# EAGLE board Orb routing checkpoint 01 (EAGLE 9.7.0)
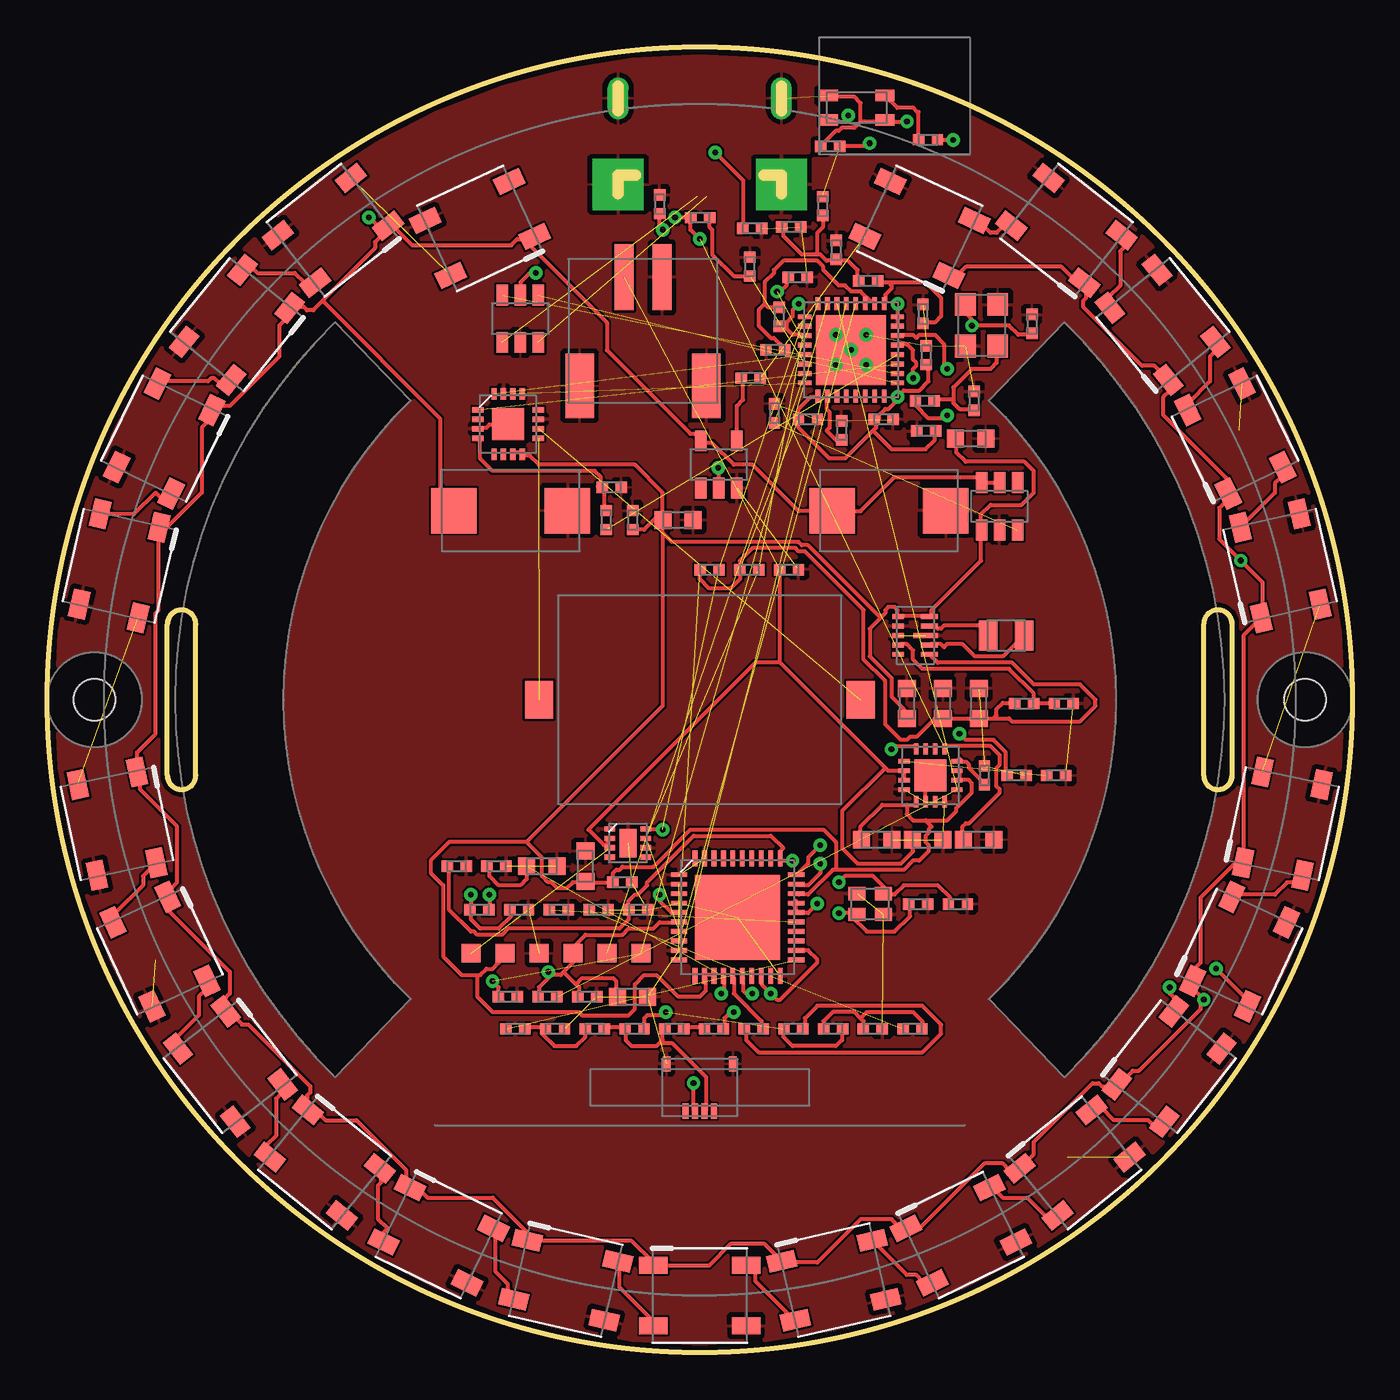
[diagram p0: board, top side]
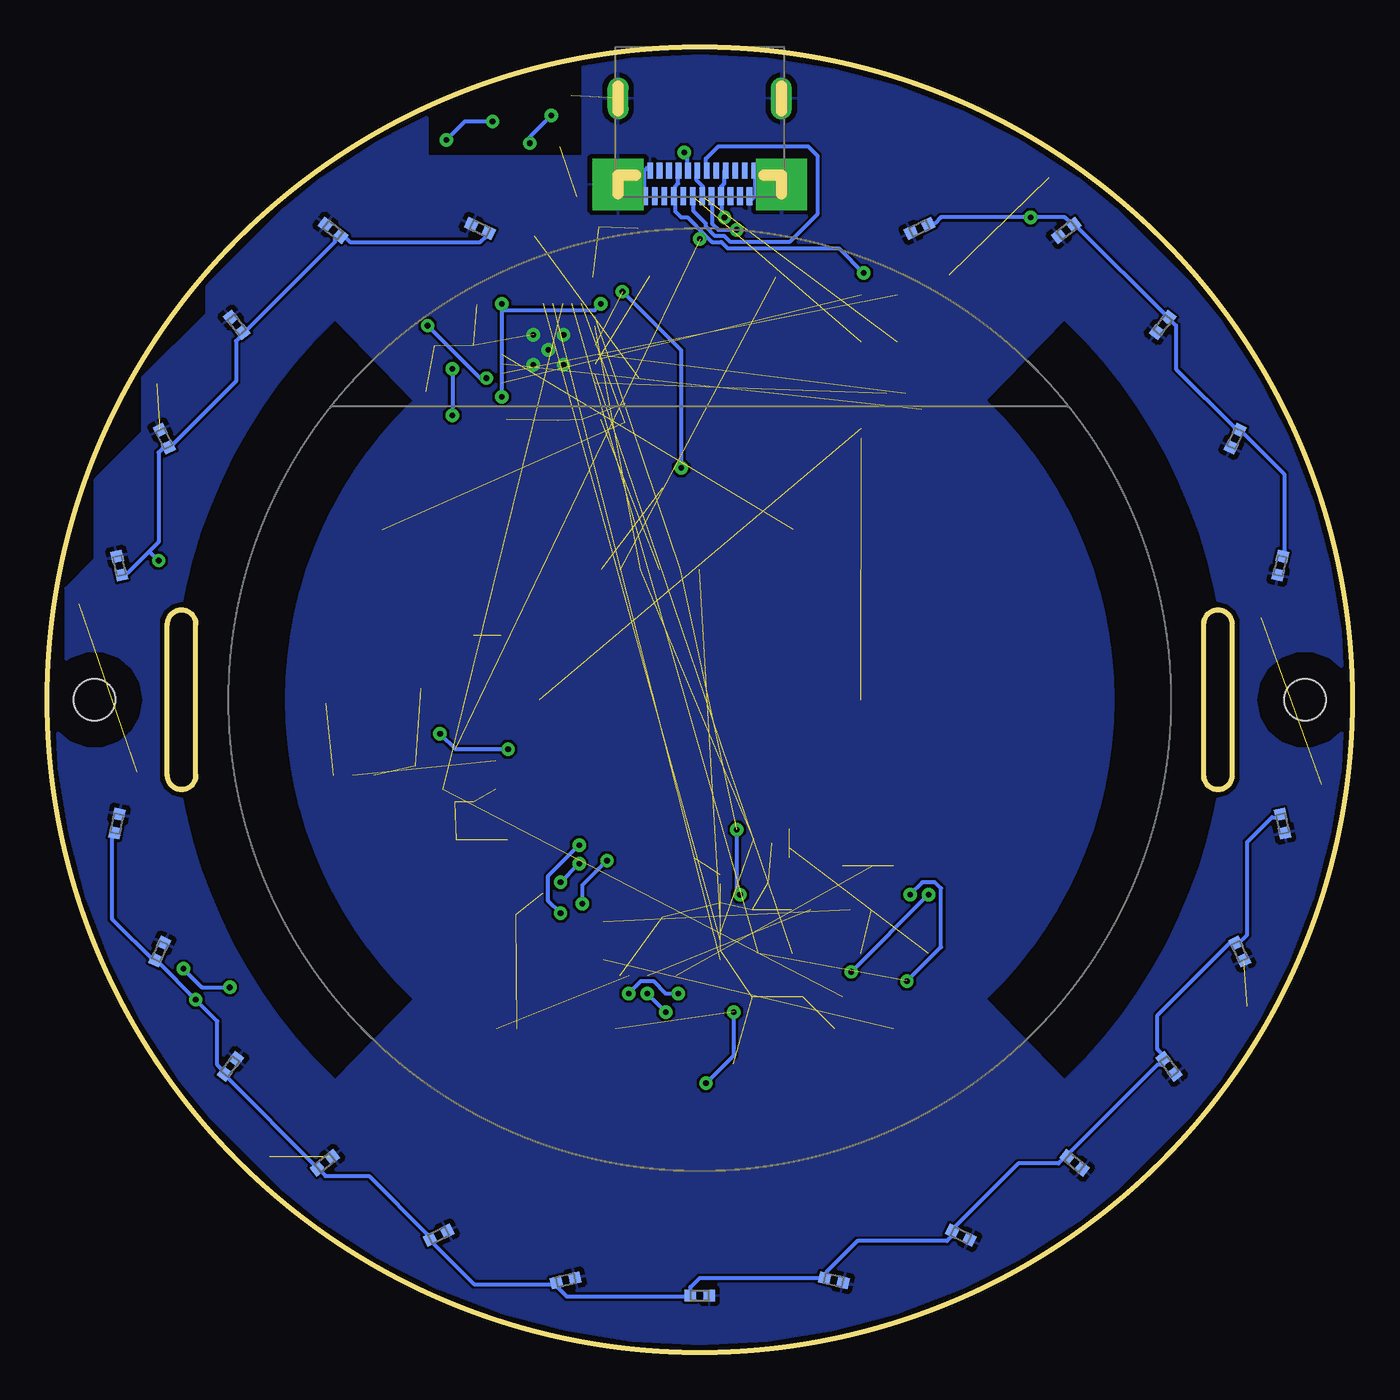
[diagram p1: board, bottom side, seen from below]

Size 69 x 69 mm. Coordinates in mm from the lower left corner, seen from the top.
Outline: 7.85,30.5 7.85,38.5 arc180 6.35,38.5 6.35,30.5 arc180 7.85,30.5
Outline: 62.65,30.5 62.65,38.5 arc180 61.15,38.5 61.15,30.5 arc180 62.65,30.5
Outline: circle at 34.5,34.5 radius 34.5
Copper layers (1*16): Top / Bottom
Stack-up Default Layer Stack: Top User Defined 0.035mm / Dielectric-1 User Defined 1.5mm / Bottom User Defined 0.035mm
Design rules: minimum drill size class=0 0.3mm, minimum drill size 0.3mm, minimum copper width class=0 0.2mm, minimum copper width 0.15mm, keepout clearance 0mil, drill distance 6mil, via restrict clearance 0mil, dimension clearance 0.25mm, restrict clearance 0mil, copper clearance wire_polygon to wire_polygon 5mil, copper clearance wire_polygon to pad_smd 5mil, copper clearance wire_polygon to via 5mil, copper clearance pad_smd to pad_smd 5mil, copper clearance pad_smd to via 5mil, copper clearance via to via 5mil, copper clearance smd to pad (same net) 5mil, copper clearance smd to via (same net) 5mil, copper clearance smd to smd (same net) 5mil
Net classes: 0 default: width 0.2 mm, drill 0.3 mm
Holes 2.2 mm at 2.5,34.5 66.5,34.5
RestrictCopper: area -0.1,32 to 5.1,37; area 63.9,32 to 69.1,37; area 49.7,14.5 to 62.3,54.5; area 6.7,14.5 to 19.3,54.5
vRestrict: area 49.7,14.5 to 62.3,54.5; area 6.7,14.5 to 19.3,54.5

## Footprints (pad centres in the part's own frame; a part is rotated, then mirrored left to right if it is on the bottom)
JOHANSON_2450AT18D = smd 1 x 0.6: 1 -1.5,-0.65; 2 1.5,-0.65; 3 1.5,0.65; 4 -1.5,0.65
C0603 = smd 0.9 x 0.95: 1 -0.8,0; 2 0.8,0
C0402 = smd 0.6 x 0.6: 1 -0.5,0; 2 0.5,0
CPOL7343 = smd 2.4 x 2.4: 1 -3,0; 2 3,0
SOT23_6 = smd 0.6 x 1.1: 1 -0.95,-1.25; 2 0,-1.25; 3 0.95,-1.25; 4 0.95,1.25; 5 0,1.25; 6 -0.95,1.25
USBC24_TE2345986 = smd 0.3 x 0.95: A1 2.625,-7.875; A2 2.125,-7.875; A3 1.625,-7.875; A4 1.125,-7.875; A5 0.625,-7.875; A6 0.125,-7.875; A7 -0.375,-7.875; A8 -0.875,-7.875; A9 -1.375,-7.875; A10 -1.875,-7.875; A11 -2.375,-7.875; A12 -2.875,-7.875 | smd 0.3 x 0.85: B1 -2.625,-6.525; B2 -2.125,-6.525; B3 -1.625,-6.525; B4 -1.125,-6.525; B5 -0.625,-6.525; B6 -0.125,-6.525; B7 0.375,-6.525; B8 0.875,-6.525; B9 1.375,-6.525; B10 1.875,-6.525; B11 2.375,-6.525; B12 2.875,-6.525 | drill 0.6 pad 2.7 square: S1 -4.32,-7.25; S2 4.32,-7.25 | drill 0.6 pad 1.075 long: S3 -4.32,-2.7; S4 4.32,-2.7
JST_S2B_PH_SM4_TB = smd 1 x 3.5: 1 -1,2.85; 2 1,2.85 | smd 1.5 x 3.4: S1 -3.35,-2.9; S2 3.35,-2.9
FPC4_PLACEHOLDER = smd 0.3 x 0.8: 1 0.75,-1.25; 2 0.25,-1.25; 3 -0.25,-1.25; 4 -0.75,-1.25 | smd 0.4 x 0.8: M1 -1.75,1.25; M2 1.75,1.25
L2016 = smd 1 x 1.6: 1 -0.95,0; 2 0.95,0
L0402 = smd 0.6 x 0.6: 1 -0.5,0; 2 0.5,0
WS2812B_5050 = smd 1.5 x 0.9: 1 -2.45,1.6; 2 -2.45,-1.6; 3 2.45,-1.6; 4 2.45,1.6
R0402 = smd 0.6 x 0.6: 1 -0.5,0; 2 0.5,0
SPK_PADS = smd 1.5 x 2: 1 -8.5,0; 2 8.5,0
TP1MM = smd 1 x 1: 1 0,0
ESP32C3_QFN32 = smd 0.7 x 0.25: 1 -2.45,1.75; 2 -2.45,1.25; 3 -2.45,0.75; 4 -2.45,0.25; 5 -2.45,-0.25; 6 -2.45,-0.75; 7 -2.45,-1.25; 8 -2.45,-1.75; 17 2.45,-1.75; 18 2.45,-1.25; 19 2.45,-0.75; 20 2.45,-0.25; 21 2.45,0.25; 22 2.45,0.75; 23 2.45,1.25; 24 2.45,1.75 | smd 0.25 x 0.7: 9 -1.75,-2.45; 10 -1.25,-2.45; 11 -0.75,-2.45; 12 -0.25,-2.45; 13 0.25,-2.45; 14 0.75,-2.45; 15 1.25,-2.45; 16 1.75,-2.45; 25 1.75,2.45; 26 1.25,2.45; 27 0.75,2.45; 28 0.25,2.45; 29 -0.25,2.45; 30 -0.75,2.45; 31 -1.25,2.45; 32 -1.75,2.45 | smd 3.7 x 3.7: 33 0,0
HVQFN40_6X6 = smd 0.85 x 0.25: 1 -3.1,2.25; 2 -3.1,1.75; 3 -3.1,1.25; 4 -3.1,0.75; 5 -3.1,0.25; 6 -3.1,-0.25; 7 -3.1,-0.75; 8 -3.1,-1.25; 9 -3.1,-1.75; 10 -3.1,-2.25; 21 3.1,-2.25; 22 3.1,-1.75; 23 3.1,-1.25; 24 3.1,-0.75; 25 3.1,-0.25; 26 3.1,0.25; 27 3.1,0.75; 28 3.1,1.25; 29 3.1,1.75; 30 3.1,2.25 | smd 0.25 x 0.85: 11 -2.25,-3.1; 12 -1.75,-3.1; 13 -1.25,-3.1; 14 -0.75,-3.1; 15 -0.25,-3.1; 16 0.25,-3.1; 17 0.75,-3.1; 18 1.25,-3.1; 19 1.75,-3.1; 20 2.25,-3.1; 31 2.25,3.1; 32 1.75,3.1; 33 1.25,3.1; 34 0.75,3.1; 35 0.25,3.1; 36 -0.25,3.1; 37 -0.75,3.1; 38 -1.25,3.1; 39 -1.75,3.1; 40 -2.25,3.1 | smd 4.5 x 4.5: 41 0,0
TDFN8_2X2 = smd 0.55 x 0.28: 1 -0.95,0.75; 2 -0.95,0.25; 3 -0.95,-0.25; 4 -0.95,-0.75; 5 0.95,-0.75; 6 0.95,-0.25; 7 0.95,0.25; 8 0.95,0.75 | smd 0.9 x 1.5: 9 0,0
VQFN16_3X3 = smd 0.6 x 0.24: 1 -1.4,0.75; 2 -1.4,0.25; 3 -1.4,-0.25; 4 -1.4,-0.75; 9 1.4,-0.75; 10 1.4,-0.25; 11 1.4,0.25; 12 1.4,0.75 | smd 0.24 x 0.6: 5 -0.75,-1.4; 6 -0.25,-1.4; 7 0.25,-1.4; 8 0.75,-1.4; 13 0.75,1.4; 14 0.25,1.4; 15 -0.25,1.4; 16 -0.75,1.4 | smd 1.68 x 1.68: 17 0,0
VSON10_2X3 = smd 0.6 x 0.25: 1 -0.9,1; 2 -0.9,0.5; 3 -0.9,0; 4 -0.9,-0.5; 5 -0.9,-1 | smd 0.9 x 0.25: 6 0.75,-1; 7 0.75,-0.5; 9 0.75,0.5; 10 0.75,1 | smd 1.3 x 0.25: 8 0.55,0
TQFN16_3X3 = smd 0.6 x 0.28: 1 -1.6,0.75; 2 -1.6,0.25; 3 -1.6,-0.25; 4 -1.6,-0.75; 9 1.6,-0.75; 10 1.6,-0.25; 11 1.6,0.25; 12 1.6,0.75 | smd 0.28 x 0.6: 5 -0.75,-1.6; 6 -0.25,-1.6; 7 0.25,-1.6; 8 0.75,-1.6; 13 0.75,1.6; 14 0.25,1.6; 15 -0.25,1.6; 16 -0.75,1.6 | smd 1.7 x 1.7: 17 0,0
SOT23_5 = smd 0.6 x 1.1: 1 -0.95,-1.25; 2 0,-1.25; 3 0.95,-1.25; 4 0.95,1.25; 5 -0.95,1.25
XTAL2016 = smd 0.9 x 0.7: 1 -0.7,-0.55; 2 0.7,-0.55; 3 0.7,0.55; 4 -0.7,0.55
ABM8_3225 = smd 1.2 x 1.1: 1 -1.1,-0.85; 2 1.1,-0.85; 3 1.1,0.85; 4 -1.1,0.85

## Placement (x,y rotation side)
ANT1  2450AT18D0100001E  [JOHANSON_2450AT18D]  42.8,65.8 0 top
C1  10uF  [C0603]  30.95,18.8 0 top
C2  100nF  [C0402]  28.55,18.8 0 top
C3  1uF  [C0402]  24.35,18.8 0 top
C4  4.7uF  [C0603]  49.25,27.1 0 top
C5  10uF  [C0603]  43.85,27.1 0 top
C6  10uF  [C0603]  46.55,27.1 0 top
C7  100nF  [C0402]  39.22,41.38 0 top
C8  10uF  [C0603]  45.45,34.3 90 top
C9  10uF  [C0603]  47.35,34.3 90 top
C10  10uF  [C0603]  49.25,34.3 90 top
C11  100nF  [C0402]  30.4,24.85 0 top
C12  4.7uF  [C0603]  28.45,25.7 90 top
C13  4.7uF  [C0603]  26.15,25.7 0 top
C14  100nF  [C0402]  23.75,25.7 0 top
C15  1uF  [C0402]  21.65,25.7 0 top
C16  100nF  [C0402]  31.25,23.4 0 top
C17  100nF  [C0402]  29.15,23.4 0 top
C18  100nF  [C0402]  27.05,23.4 0 top
C19  100nF  [C0402]  24.95,23.4 0 top
C20  12pF  [C0402]  46.05,23.7 0 top
C21  12pF  [C0402]  48.15,23.7 0 top
C22  TBD  [C0402]  26.85,17.1 0 top
C23  TBD  [C0402]  43.65,17.1 0 top
C24  TBD  [C0402]  28.95,17.1 0 top
C25  TBD  [C0402]  41.55,17.1 0 top
C26  TBD  [C0402]  31.05,17.1 0 top
C27  TBD  [C0402]  33.15,17.1 0 top
C28  TBD  [C0402]  39.45,17.1 0 top
C29  10uF  [C0603]  33.35,44 0 top
C30  100nF  [C0402]  30.95,44 90 top
C31  10uF  [C0603]  48.82,48.3 0 top
C32  100uF  [CPOL7343]  24.5,44.5 0 top
C33  100uF  [CPOL7343]  44.5,44.5 0 top
C34  1uF  [C0402]  38.5,53 180 top
C35  100nF  [C0402]  40.22,49.32 0 top
C36  100nF  [C0402]  44.22,49.32 0 top
C37  1uF  [C0402]  42,48.75 90 top
C38  1uF  [C0402]  46.48,52.72 90 top
C39  10nF  [C0402]  46.47,48.71 180 top
C40  16pF  [C0402]  49,50.3 90 top
C41  16pF  [C0402]  52.07,54.37 90 top
C42  1pF  [C0402]  46.3,54.9 90 top
C43  1pF  [C0402]  41.72,58.28 90 top
C44  1pF  [C0402]  39.34,59.5 0 top
C45  1pF  [C0402]  41.4,63.75 180 top
C101  100nF  [C0402]  46.12,59.42 155 bottom
C102  100nF  [C0402]  53.89,59.32 142 bottom
C103  100nF  [C0402]  58.98,54.32 129 bottom
C104  100nF  [C0402]  62.81,48.31 116 bottom
C105  100nF  [C0402]  65.19,41.59 103 bottom
C106  100nF  [C0402]  65.31,27.95 78 bottom
C107  100nF  [C0402]  63.05,21.19 65 bottom
C108  100nF  [C0402]  59.32,15.11 52 bottom
C109  100nF  [C0402]  54.32,10.02 39 bottom
C110  100nF  [C0402]  48.31,6.19 26 bottom
C111  100nF  [C0402]  41.59,3.81 13 bottom
C112  100nF  [C0402]  34.5,3 0 bottom
C113  100nF  [C0402]  27.41,3.81 347 bottom
C114  100nF  [C0402]  20.69,6.19 334 bottom
C115  100nF  [C0402]  14.68,10.02 321 bottom
C116  100nF  [C0402]  9.68,15.11 308 bottom
C117  100nF  [C0402]  5.95,21.19 295 bottom
C118  100nF  [C0402]  3.69,27.95 282 bottom
C119  100nF  [C0402]  3.81,41.59 257 bottom
C120  100nF  [C0402]  6.19,48.31 244 bottom
C121  100nF  [C0402]  10.02,54.32 231 bottom
C122  100nF  [C0402]  15.11,59.32 218 bottom
C123  100nF  [C0402]  22.88,59.42 205 bottom
D1  USBLC6-2SC6  [SOT23_6]  25.01,54.65 0 top
J1  USB-C  [USBC24_TE2345986]  34.5,69 0 bottom
J2  BAT  [JST_S2B_PH_SM4_TB]  31.5,54 0 top
J3  NFC antenna  [FPC4_PLACEHOLDER]  34.5,14 0 top
L1  0.47uH  [L2016]  50.7,37.9 0 top
L2  TBD  [L0402]  24.75,17.1 0 top
L3  TBD  [L0402]  45.75,17.1 0 top
L4  2nH  [L0402]  38.7,54.75 90 top
L5  24nH  [L0402]  46.4,50.3 0 top
L6  2.4nH  [L0402]  43.4,56.65 180 top
LED1  WS2812B  [WS2812B_5050]  46.12,59.42 155 top
LED2  WS2812B  [WS2812B_5050]  53.89,59.32 142 top
LED3  WS2812B  [WS2812B_5050]  58.98,54.32 129 top
LED4  WS2812B  [WS2812B_5050]  62.81,48.31 116 top
LED5  WS2812B  [WS2812B_5050]  65.19,41.59 103 top
LED6  WS2812B  [WS2812B_5050]  65.31,27.95 78 top
LED7  WS2812B  [WS2812B_5050]  63.05,21.19 65 top
LED8  WS2812B  [WS2812B_5050]  59.32,15.11 52 top
LED9  WS2812B  [WS2812B_5050]  54.32,10.02 39 top
LED10  WS2812B  [WS2812B_5050]  48.31,6.19 26 top
LED11  WS2812B  [WS2812B_5050]  41.59,3.81 13 top
LED12  WS2812B  [WS2812B_5050]  34.5,3 0 top
LED13  WS2812B  [WS2812B_5050]  27.41,3.81 347 top
LED14  WS2812B  [WS2812B_5050]  20.69,6.19 334 top
LED15  WS2812B  [WS2812B_5050]  14.68,10.02 321 top
LED16  WS2812B  [WS2812B_5050]  9.68,15.11 308 top
LED17  WS2812B  [WS2812B_5050]  5.95,21.19 295 top
LED18  WS2812B  [WS2812B_5050]  3.69,27.95 282 top
LED19  WS2812B  [WS2812B_5050]  3.81,41.59 257 top
LED20  WS2812B  [WS2812B_5050]  6.19,48.31 244 top
LED21  WS2812B  [WS2812B_5050]  10.02,54.32 231 top
LED22  WS2812B  [WS2812B_5050]  15.11,59.32 218 top
LED23  WS2812B  [WS2812B_5050]  22.88,59.42 205 top
R1  10k  [R0402]  22.85,23.4 0 top
R3  100k  [R0402]  26.45,18.8 0 top
R4  5.1k  [R0402]  32.38,60.7 90 top
R5  5.1k  [R0402]  37.27,59.42 0 top
R6  120k  [R0402]  34.52,59.99 0 top
R7  220k  [R0402]  37.15,57.4 90 top
R8  1.8k  [R0402]  49.55,30.5 90 top
R9  1.13k  [R0402]  51.25,30.5 0 top
R10  10k  [R0402]  53.35,30.5 0 top
R11  560k  [R0402]  51.65,34.3 0 top
R12  100k  [R0402]  53.75,34.3 0 top
R13  2.2k  [R0402]  35.02,41.38 0 top
R14  2.2k  [R0402]  37.12,41.38 0 top
R15  TBD  [R0402]  35.25,17.1 0 top
R16  TBD  [R0402]  37.35,17.1 0 top
R17  2k  [R0402]  29.55,44 90 top
R18  100k  [R0402]  29.85,45.73 0 top
R19  100k  [R0402]  38.45,49.65 90 top
R20  100k  [R0402]  39.68,56.84 0 top
R21  33  [R0402]  37.2,51.51 0 top
R22  0  [R0402]  41,60.6 90 top
R23  0  [R0402]  46.57,64.11 0 top
SPK1  CMS-151103-088SP  [SPK_PADS]  34.5,34.5 0 top
TP1  EN  [TP1MM]  31.4,21.1 0 top
TP2  BOOT  [TP1MM]  29.6,21.1 0 top
TP3  3V3  [TP1MM]  27.8,21.1 0 top
TP4  GND  [TP1MM]  26,21.1 0 top
TP5  VSYS  [TP1MM]  24.2,21.1 0 top
TP6  VBAT  [TP1MM]  22.4,21.1 0 top
U1  ESP32-C3FH4X  [ESP32C3_QFN32]  42.5,53 270 top
U2  PN7161A1HN/C101E  [HVQFN40_6X6]  36.5,23 0 top
U3  MAX17048G+T10  [TDFN8_2X2]  30.7,26.92 0 top
U4  BQ24074RGTR  [VQFN16_3X3]  46.7,30.5 0 top
U5  TPS63802DLAR  [VSON10_2X3]  45.9,37.9 0 top
U6  MAX98357AETE+T  [TQFN16_3X3]  24.37,49.08 0 top
U7  TPS22918DBVR  [SOT23_6]  50.35,44.73 0 top
U8  SN74LV1T34DBVR  [SOT23_5]  35.51,46.94 0 top
Y1  27.12MHz  [XTAL2016]  43.5,23.7 0 top
Y2  40MHz  [ABM8_3225]  49.4,54.3 90 top

## Library data of the parts
ANT1 C1-C45 C101-C123 D1 J1-J3 L1-L6 LED1-LED23 R1 R3-R23 SPK1 TP1-TP6 U1-U8 Y1 Y2 = orb

## Nets
3V3: C1.1 C2.1 C9.1 C10.1 C19.1 C35.1 C36.1 C38.1 C39.1 L4.1 R1.1 R3.1 R11.1 R13.1 R14.1 TP3.1 U1.11 U1.17 U1.31 U1.32 U2.6 U5.6
AMP_SD: R17.1 U1.28
AMP_SD_R: R17.2 R18.1 U6.4
ANT_FEED: ANT1.1 C45.1 R22.2
ANT_GND_TUNE: ANT1.3 R23.1
BOOT: TP2.1 U1.15
CC1: J1.A5 R4.1
CC2: J1.B5 R5.1
CHG_STATUS: R3.2 U1.6 U4.9
EN: C3.1 R1.2 TP1.1 U1.7
ESP_RF_CHIP: C42.1 L6.1 U1.1
ESP_VDD_RF: C34.1 L4.2 U1.2 U1.3
ESP_VDD_SPI: C37.1 U1.18
ESP_XTAL_DRIVE: C40.1 L5.2 Y2.1
ESP_XTAL_N: C41.1 U1.29 Y2.3
ESP_XTAL_P: L5.1 U1.30
FB_3V3: R11.2 R12.1 U5.4
GND: ANT1.2 ANT1.4 C1.2 C2.2 C3.2 C4.2 C5.2 C6.2 C7.2 C8.2 C9.2 C10.2 C11.2 C12.2 C13.2 C14.2 C15.2 C16.2 C17.2 C18.2 C19.2 C20.2 C21.2 C22.2 C23.2 C29.2 C30.2 C31.2 C32.2 C33.2 C34.2 C35.2 C36.2 C37.2 C38.2 C39.2 C40.2 C41.2 C42.2 C43.2 C44.2 C45.2 C101.2 C102.2 C103.2 C104.2 C105.2 C106.2 C107.2 C108.2 C109.2 C110.2 C111.2 C112.2 C113.2 C114.2 C115.2 C116.2 C117.2 C118.2 C119.2 C120.2 C121.2 C122.2 C123.2 D1.2 J1.A1 J1.A12 J1.B1 J1.B12 J1.S1 J1.S2 J1.S3 J1.S4 J2.2 J2.S1 J2.S2 J3.M1 J3.M2 LED1.3 LED2.3 LED3.3 LED4.3 LED5.3 LED6.3 LED7.3 LED8.3 LED9.3 LED10.3 LED11.3 LED12.3 LED13.3 LED14.3 LED15.3 LED16.3 LED17.3 LED18.3 LED19.3 LED20.3 LED21.3 LED22.3 LED23.3 R4.2 R5.2 R7.2 R8.2 R9.2 R10.2 R12.2 R18.2 R19.2 R20.2 R23.2 TP4.1 U1.33 U2.1 U2.2 U2.3 U2.4 U2.9 U2.20 U2.39 U2.41 U3.1 U3.4 U3.6 U3.9 U4.4 U4.6 U4.8 U4.17 U5.2 U5.3 U5.8 U6.3 U6.11 U6.15 U6.17 U7.2 U8.3 Y1.2 Y1.4 Y2.2 Y2.4
I2C_SCL: R14.2 U1.10 U2.7 U3.7
I2C_SDA: R13.2 U1.9 U2.5 U3.8
I2S_BCLK: U1.13 U6.16
I2S_DIN: U1.27 U6.1
I2S_LRCLK: U1.16 U6.14
ILIM: R8.1 U4.12
ISET: R9.1 U4.16
LED_CHAIN_1: LED1.2 LED2.4
LED_CHAIN_2: LED2.2 LED3.4
LED_CHAIN_3: LED3.2 LED4.4
LED_CHAIN_4: LED4.2 LED5.4
LED_CHAIN_5: LED5.2 LED6.4
LED_CHAIN_6: LED6.2 LED7.4
LED_CHAIN_7: LED7.2 LED8.4
LED_CHAIN_8: LED8.2 LED9.4
LED_CHAIN_9: LED9.2 LED10.4
LED_CHAIN_10: LED10.2 LED11.4
LED_CHAIN_11: LED11.2 LED12.4
LED_CHAIN_12: LED12.2 LED13.4
LED_CHAIN_13: LED13.2 LED14.4
LED_CHAIN_14: LED14.2 LED15.4
LED_CHAIN_15: LED15.2 LED16.4
LED_CHAIN_16: LED16.2 LED17.4
LED_CHAIN_17: LED17.2 LED18.4
LED_CHAIN_18: LED18.2 LED19.4
LED_CHAIN_19: LED19.2 LED20.4
LED_CHAIN_20: LED20.2 LED21.4
LED_CHAIN_21: LED21.2 LED22.4
LED_CHAIN_22: LED22.2 LED23.4
LED_DATA_0: LED1.4 R21.2
LED_DATA_3V3: R20.1 U1.12 U8.2
LED_DATA_BUF: R21.1 U8.4
LED_EN: R19.1 U1.8 U7.3
NFC_ANT_N: C25.2 C26.2 C28.1 J3.3
NFC_ANT_P: C24.2 C26.1 C27.1 J3.2
NFC_EMC1: C22.1 C24.1 L2.2
NFC_EMC2: C23.1 C25.1 L3.2
NFC_IRQ: U1.4 U2.8
NFC_RXC1: C27.2 R15.1
NFC_RXC2: C28.2 R16.1
NFC_RXN: R16.2 U2.15
NFC_RXP: R15.2 U2.16
NFC_TX1: L2.1 U2.21
NFC_TX2: L3.1 U2.19
NFC_VDD: C15.1 C16.1 U2.26 U2.27 U2.31
NFC_VDDHF: C18.1 U2.25
NFC_VEN: U1.5 U2.10
NFC_VMID: C17.1 U2.17
NFC_XTAL1: C20.1 U2.30 Y1.1
NFC_XTAL2: C21.1 U2.29 Y1.3
RF_50OHM: C43.1 C44.1 L6.2 R22.1
SPK_N: SPK1.2 U6.10
SPK_P: SPK1.1 U6.9
SW1: L1.1 U5.9
SW2: L1.2 U5.7
TS: R10.1 U4.1
USB_DN: D1.4 U1.25
USB_DN_J: D1.3 J1.A7 J1.B7
USB_DP: D1.6 U1.26
USB_DP_J: D1.1 J1.A6 J1.B6
VBAT: C6.1 C7.1 J2.1 TP6.1 U3.2 U3.3 U4.2 U4.3
VBUS: C4.1 D1.5 J1.A4 J1.A9 J1.B4 J1.B9 R6.1 U4.13
VBUS_SENSE: R6.2 R7.1 U1.14
VDD_TX: C13.1 C14.1 U2.14 U2.18 U2.22
VLED: C32.1 C33.1 C101.1 C102.1 C103.1 C104.1 C105.1 C106.1 C107.1 C108.1 C109.1 C110.1 C111.1 C112.1 C113.1 C114.1 C115.1 C116.1 C117.1 C118.1 C119.1 C120.1 C121.1 C122.1 C123.1 LED1.1 LED2.1 LED3.1 LED4.1 LED5.1 LED6.1 LED7.1 LED8.1 LED9.1 LED10.1 LED11.1 LED12.1 LED13.1 LED14.1 LED15.1 LED16.1 LED17.1 LED18.1 LED19.1 LED20.1 LED21.1 LED22.1 LED23.1 U7.5 U7.6 U8.5
VSYS: C5.1 C8.1 C11.1 C12.1 C29.1 C30.1 C31.1 TP5.1 U2.12 U2.13 U2.28 U4.5 U4.10 U4.11 U5.1 U5.10 U6.7 U6.8 U7.1

## Tracks (layer width: path | path; a pad name or v marks a point on that pad's centre or on a via)
3V3  (via drill 0.3)  (2 unrouted)
  Top 0.2: 39.08,54.12 38.75,54.12 L4.1 | 39.08,54.12 39.41,53.79 39.9,53.79 U1.11 | 44.96,54.77 44.96,54.28 U1.31 | U1.17 40.71,50.52 40.39,50.52 39.73,49.87 39.73,49.38 C35.1 39.73,49.22 39.73,48.89 41.37,47.25 42.18,47.25 43.66,48.73 | 43.66,48.73 43.82,48.89 43.82,49.22 | 43.82,49.22 43.98,49.38 43.98,49.54 44.31,49.87 44.47,49.87 44.8,50.2 44.8,50.36 v44.96,50.52 45.29,50.85 46.11,50.85 46.6,51.34 46.6,52.16 C38.1 | 43.82,49.22 C36.1 | 43.66,48.73 44.64,47.74 46.44,47.74 46.93,48.23 46.93,48.56 C39.1 | v44.96,55.43 44.96,54.77 | 44.96,54.77 U1.32 | 39.08,54.12 39.08,54.45 39.41,54.77 39.41,55.1 v39.73,55.43 | R13.1 34.5,41.37 34.5,40.88 34.99,40.39 36.13,40.39 36.63,40.88 36.63,41.37 R14.1 36.63,41.53 36.63,41.86 37.28,42.51 39.57,42.51 39.73,42.35 40.06,42.35 43.16,39.24 43.16,36.63 44.31,35.48 44.31,33.19 45.13,32.37 45.45,32.37 45.62,32.54 45.95,32.54 46.93,33.52 47.25,33.52 C9.1 47.42,33.52 49.22,33.52 C10.1 49.38,33.52 50.03,33.52 | 50.03,33.52 50.2,33.68 50.2,34.01 50.52,34.34 51.01,34.34 R11.1 | 50.03,33.52 50.85,33.52 51.01,33.35 54.61,33.35 55.43,34.17 55.43,34.5 54.61,35.32 52.16,35.32 51.01,36.46 47.09,36.46 46.76,36.79 U5.6 | C19.1 24.53,23.38 24.53,23.05 23.87,22.4 22.89,22.4 22.4,22.89 22.4,23.38 R1.1 22.4,23.55 v22.4,24.2 | 26.65,19.95 26,19.29 26,18.8 R3.1 | 26.65,19.95 27.14,19.95 27.31,20.11 | 27.31,20.11 28.12,20.93 28.12,21.09 27.96,21.26 TP3.1 27.63,21.09 27.63,21.26 28.45,22.07 30.41,22.07 30.74,22.4 32.05,22.4 32.37,22.73 33.35,22.73 U2.6 | 27.31,20.11 27.96,19.46 | 27.96,19.46 28.12,19.29 28.12,18.8 C2.1 | 27.96,19.46 28.29,19.79 29.92,19.79 30.09,19.62 30.09,18.8 C1.1
  Top 0.2: 26.65,19.95 v26.49,20.11
  Bottom 0.2: v44.96,50.52 44.96,55.1 | v39.73,55.43 40.06,55.1 44.96,55.1 | 44.96,55.1 v44.96,55.43 | v26.49,20.11 v22.4,24.2
AMP_SD  (1 unrouted)
AMP_SD_R
  Top 0.2: U6.4 22.89,48.23 22.89,47.25 23.55,46.6 28.94,46.6 29.27,46.27 29.27,45.95 29.1,45.78 29.27,45.62 R18.1 29.43,45.62 29.43,44.64 R17.2
ANT_FEED  (via drill 0.3)  (1 unrouted)
  Top 0.2: v43.49,63.93 43.33,63.77 42.02,63.77 C45.1 | v42.35,65.4 42.35,65.08 41.37,65.08 ANT1.1
  Bottom 0.2: v43.49,63.93 43.49,64.26 v42.35,65.4
ANT_GND_TUNE
  Top 0.2: ANT1.3 44.95,65.8 45.8,65.8 45.98,65.59 46.07,65.58 R23.1
BOOT  (1 unrouted)
CC1  (via drill 0.3)
  Top 0.2: v32.54,59.35 32.37,59.52 32.37,60.17 R4.1
  Bottom 0.2: v32.54,59.35 33.52,59.35 33.85,59.68 33.85,60.99 J1.A5
CC2  (via drill 0.3)
  Top 0.2: v35.32,63.44 36.79,61.97 36.79,59.52 R5.1
  Bottom 0.2: v35.32,63.44 35.15,63.28 35.15,62.62 J1.B5
CHG_STATUS  (2 unrouted)
EN  (via drill 0.3)  (2 unrouted)
  Top 0.2: v23.38,24.2 23.38,23.55 R1.2 | v23.55,19.62 23.87,19.29 23.87,18.8 C3.1
  Bottom 0.2: v23.38,24.2 22.73,24.85 22.07,24.85 21.75,24.53 21.75,21.42 v23.55,19.62
ESP_RF_CHIP
  Top 0.2: 44.47,56.57 44.64,56.41 44.64,56.25 44.31,55.92 44.31,55.59 U1.1 | 44.47,56.57 43.98,56.57 L6.1 | 44.47,56.57 46.44,56.57 47.25,55.75 47.25,54.77 46.93,54.45 46.44,54.45 C42.1
ESP_VDD_RF
  Top 0.2: 43.49,55.59 43.33,55.59 U1.3 | 43.49,55.59 43.66,55.59 U1.2 | 37.93,55.43 38.1,55.27 38.59,55.27 L4.2 | 37.93,55.43 37.93,56.57 38.42,57.06 38.42,57.23 38.91,57.72 40.71,57.72 41.04,57.39 41.04,57.23 41.86,56.41 42.18,56.41 42.51,56.08 43,56.08 43.49,55.59 | 37.93,55.43 37.61,55.1 37.61,54.28 38.26,53.63 38.42,53.63 38.91,53.14 C34.1
ESP_VDD_SPI
  Top 0.2: C37.1 41.86,48.23 41.69,48.23 41.2,48.73 41.37,48.89 41.37,49.71 41.2,49.87 41.2,50.52 U1.18
ESP_XTAL_DRIVE
  Top 0.2: 47.91,50.36 47.91,51.01 48.89,51.99 49.87,51.99 50.2,52.32 50.2,53.14 Y2.1 | 47.91,50.36 47.91,50.2 48.23,49.87 48.89,49.87 C40.1 | 47.91,50.36 46.93,50.36 L5.2
ESP_XTAL_N  (via drill 0.3)
  Top 0.2: 49.05,54.45 49.22,54.28 50.85,54.28 51.34,53.79 51.99,53.79 C41.1 | 49.05,54.45 48.56,54.94 48.56,55.27 Y2.3 | v45.78,51.5 45.78,51.99 45.95,52.16 45.95,52.32 45.78,52.48 45.78,52.98 45.45,53.3 44.96,53.3 U1.29 | 49.05,54.45 v48.89,54.28
  Bottom 0.2: v45.78,51.5 46.11,51.5 v48.89,54.28
ESP_XTAL_P  (via drill 0.3)
  Top 0.2: v47.58,49.54 47.42,49.38 46.6,49.38 45.95,50.03 45.95,50.2 L5.1 | v47.58,51.99 47.42,52.16 47.42,53.3 46.93,53.79 46.11,53.79 45.95,53.63 45.78,53.79 44.96,53.79 U1.30
  Bottom 0.2: v47.58,51.99 v47.58,49.54
FB_3V3
  Top 0.2: 52.32,34.34 52.16,34.5 52.16,34.83 50.85,36.13 46.27,36.13 45.78,36.63 45.78,37.12 45.45,37.44 45.13,37.44 U5.4 | 52.32,34.34 52.16,34.17 R11.2 52.32,34.34 | 52.32,34.34 53.14,34.34 R12.1
GND  (via drill 0.3, 0.3 pad 0.65)  (41 unrouted)
  Top 0.2: U4.17 46.6,30.41 46.44,30.25 46.44,29.1 U4.6 | U6.17 24.36,49.05 23.38,49.05 23.22,48.89 22.89,48.89 U6.3 | 43,65.08 42.67,64.75 42.02,64.75 41.86,64.58 41.69,64.58 41.04,63.93 41.04,63.77 C45.2 | 43,65.08 44.15,65.08 ANT1.2 44.31,65.08 v45.45,65.08 | v47.91,64.09 47.09,64.09 R23.2 | 43,65.08 43,66.06 42.67,66.38 41.37,66.38 ANT1.4
  Bottom 0.2: J1.B12 31.56,62.46 31.56,61.15 31.72,60.99 31.88,60.99 J1.A1 | J1.A12 37.44,61.15 37.44,62.46 37.28,62.62 37.12,62.62 J1.B1 | v47.91,64.09 46.93,65.08 v45.45,65.08
  other vias: 42.5,53 41.7,52.2 43.3,52.2 41.7,53.8 43.3,53.8
  pour Top: 68.6,29.1 68.6,39.9 68.08,40.42 68.08,44.62 66.54,46.16 66.54,49.04 64.03,51.55 64.03,53.01 53.01,64.03 51.55,64.03 49.04,66.54 46.16,66.54 44.62,68.08 40.42,68.08 39.9,68.6 29.1,68.6 28.58,68.08 24.38,68.08 22.84,66.54 19.96,66.54 17.45,64.03 15.99,64.03 4.97,53.01 4.97,51.55 2.46,49.04 2.46,46.16 0.92,44.62 0.92,40.42 0.4,39.9 0.4,29.1 0.92,28.58 0.92,24.38 2.46,22.84 2.46,19.96 4.97,17.45 4.97,15.99 15.99,4.97 17.45,4.97 19.96,2.46 22.84,2.46 24.38,0.92 28.58,0.92 29.1,0.4 39.9,0.4 40.42,0.92 44.62,0.92 46.16,2.46 49.04,2.46 51.55,4.97 53.01,4.97 64.03,15.99 64.03,17.45 66.54,19.96 66.54,22.84 68.08,24.38 68.08,28.58
  pour Bottom: 68.6,34.5 68.08,35.02 68.08,40.42 66.54,41.96 66.54,46.16 64.03,48.67 64.03,51.55 60.62,54.96 60.62,56.42 53.01,64.03 51.55,64.03 49.04,66.54 46.16,66.54 44.62,68.08 40.42,68.08 39.9,68.6 29.1,68.6 28.58,68.08 24.38,68.08 22.84,66.54 19.96,66.54 17.45,64.03 15.99,64.03 4.97,53.01 4.97,51.55 2.46,49.04 2.46,46.16 0.92,44.62 0.92,40.42 0.4,39.9 0.4,29.1 0.92,28.58 0.92,24.38 2.46,22.84 2.46,19.96 4.97,17.45 4.97,15.99 15.99,4.97 17.45,4.97 19.96,2.46 22.84,2.46 24.38,0.92 28.58,0.92 29.1,0.4 39.9,0.4 40.42,0.92 44.62,0.92 46.16,2.46 49.04,2.46 51.55,4.97 53.01,4.97 64.03,15.99 64.03,17.45 66.54,19.96 66.54,22.84 68.08,24.38 68.08,28.58 68.6,29.1
I2C_SCL  (3 unrouted)
I2C_SDA  (via drill 0.3)  (2 unrouted)
  Top 0.2: v32.54,27.63 31.72,27.63 U3.8 | v32.37,24.2 32.37,23.87 33.03,23.22 33.35,23.22 U2.5
  Bottom 0.2: v32.54,27.63 32.54,24.36 v32.37,24.2
I2S_BCLK  (1 unrouted)
I2S_DIN  (1 unrouted)
I2S_LRCLK  (1 unrouted)
ILIM
  Top 0.2: R8.1 49.54,30.09 48.73,30.9 48.73,31.07 48.56,31.23 48.4,31.23 48.23,31.39 48.07,31.23 U4.12
ISET  (via drill 0.3)
  Top 0.2: v44.64,31.88 44.8,32.05 45.95,32.05 U4.16 | v48.23,32.7 48.56,32.37 50.03,32.37 50.69,31.72 50.69,30.58 R9.1
  Bottom 0.2: v44.64,31.88 47.42,31.88 v48.23,32.7
LED_CHAIN_1
  Top 0.2: LED1.2 49.05,59.68 49.38,59.68 49.87,59.19 50.2,59.19 50.52,59.52 50.85,59.52 LED2.4
LED_CHAIN_2
  Top 0.2: LED3.4 56.08,55.27 56.08,55.75 56.74,56.41 56.74,58.21 57.06,58.53 57.06,58.86 56.9,59.02 LED2.2
LED_CHAIN_3
  Top 0.2: LED4.4 60.33,49.87 60.33,50.2 61.48,51.34 61.48,52.65 61.8,52.98 61.8,53.3 LED3.2
LED_CHAIN_4
  Top 0.2: LED5.4 63.11,43.66 64.91,45.45 64.91,45.95 65.24,46.27 65.24,46.76 LED4.2
LED_CHAIN_5  (1 unrouted)
LED_CHAIN_6
  Top 0.2: LED7.4 62.78,24.2 64.91,24.2 65.56,24.85 65.89,24.85 66.22,25.18 LED6.2
LED_CHAIN_7  (via drill 0.3)
  Top 0.2: v59.35,19.29 59.35,18.97 59.68,18.64 59.68,18.15 LED8.4 | v61.8,20.27 63.44,18.64 63.44,18.31 LED7.2
  Bottom 0.2: v59.35,19.29 60.82,19.29 v61.8,20.27
LED_CHAIN_8
  Top 0.2: LED9.4 55.27,12.92 55.75,12.92 56.41,12.26 58.21,12.26 58.53,11.94 58.86,11.94 59.02,12.1 LED8.2
LED_CHAIN_9
  Top 0.2: LED9.2 53.3,7.2 52.81,7.2 51.83,8.18 50.52,8.18 49.87,8.83 LED10.4
LED_CHAIN_10
  Top 0.2: LED11.4 43.66,5.89 45.45,4.09 45.95,4.09 46.27,3.76 46.76,3.76 LED10.2
LED_CHAIN_11
  Top 0.2: LED12.4 36.95,4.58 37.44,4.58 37.44,3.76 39.41,1.8 LED11.2
LED_CHAIN_12
  Top 0.2: LED13.4 30.25,4.74 30.25,3.43 32.05,1.64 31.88,1.47 32.05,1.31 LED12.2
LED_CHAIN_13
  Top 0.2: LED14.4 23.71,6.54 23.71,4.25 24.36,3.6 24.36,3.11 24.53,2.95 LED13.2
LED_CHAIN_14
  Top 0.2: LED15.4 17.66,9.65 17.66,8.99 17.5,8.83 17.5,7.03 17.99,6.54 17.66,6.21 17.66,5.89 LED14.2
LED_CHAIN_15
  Top 0.2: LED15.2 11.61,10.46 11.61,10.96 12.1,11.45 12.1,13.41 12.43,13.73 12.43,14.06 LED16.4
LED_CHAIN_16
  Top 0.2: LED16.2 6.87,16.19 6.87,16.68 8.01,17.82 8.01,18.8 8.34,19.13 8.34,19.62 LED17.4
LED_CHAIN_17
  Top 0.2: LED17.2 3.6,22.89 3.6,23.22 5.07,24.69 5.07,25.18 5.72,25.84 LED18.4
LED_CHAIN_18  (1 unrouted)
LED_CHAIN_19
  Top 0.2: LED19.2 2.95,44.31 4.58,44.31 5.72,45.45 6.05,45.13 6.38,45.13 6.54,45.29 LED20.4
LED_CHAIN_20
  Top 0.2: LED20.2 5.89,51.34 8.5,51.34 8.67,51.5 8.83,51.5 9.16,51.18 9.48,51.18 9.65,51.34 LED21.4
LED_CHAIN_21
  Top 0.2: LED22.4 14.06,56.57 13.57,56.57 13.08,57.06 11.12,57.06 10.79,57.39 10.46,57.39 LED21.2
LED_CHAIN_22  (1 unrouted)
LED_DATA_0  (1 unrouted)
LED_DATA_3V3  (via drill 0.3)  (1 unrouted)
  Top 0.2: v35.48,46.76 35.48,45.78 U8.2 | v38.59,56.08 38.75,56.08 39.08,56.41 39.08,56.74 R20.1
  Bottom 0.2: v35.48,46.76 35.48,52.98 v38.59,56.08
LED_DATA_BUF
  Top 0.2: R21.1 36.79,51.5 36.79,50.36 36.46,50.03 36.46,48.23 U8.4
LED_EN  (2 unrouted)
NFC_ANT_N  (via drill 0.3)  (1 unrouted)
  Top 0.2: C28.1 38.91,17.01 38.91,16.68 39.41,16.19 41.69,16.19 42.02,16.52 42.02,17.01 C25.2 | v32.7,17.99 32.54,17.82 31.72,17.82 31.56,17.66 31.56,17.17 C26.2 | v34.17,14.23 34.17,12.75 J3.3
  Bottom 0.2: v32.7,17.99 32.7,15.7 v34.17,14.23
NFC_ANT_P
  Top 0.2: C24.2 29.59,17.17 30.41,17.17 C26.1 30.58,17.01 30.58,16.52 30.9,16.19 32.21,16.19 32.37,16.35 | 32.37,16.35 32.54,16.52 32.54,17.01 C27.1 | 32.37,16.35 33.03,16.35 34.83,14.55 34.83,12.75 J3.2
NFC_EMC1
  Top 0.2: 26.16,17.17 26.32,17.17 C22.1 26.16,17.17 | 26.16,17.17 25.34,17.17 L2.2 | 26.16,17.17 26.16,16.84 26.82,16.19 27.96,16.19 28.45,16.68 28.45,17.01 C24.1
NFC_EMC2
  Top 0.2: 43,17.66 43.16,17.5 43.16,17.17 C23.1 | 43,17.66 42.67,17.99 41.53,17.99 41.04,17.5 41.04,17.17 C25.1 | 43,17.66 43.33,17.99 45.78,17.99 46.27,17.5 46.27,17.17 L3.2
NFC_IRQ  (1 unrouted)
NFC_RXC1
  Top 0.2: C27.2 33.68,17.17 34.66,17.17 R15.1
NFC_RXC2
  Top 0.2: C28.2 40.06,17.17 40.06,17.66 40.71,18.31 46.27,18.31 47.25,17.33 47.25,16.84 46.27,15.86 37.61,15.86 36.95,16.52 36.95,17.01 R16.1
NFC_RXN
  Top 0.2: R16.2 37.77,17.17 37.77,17.5 36.3,18.97 36.3,19.79 U2.15
NFC_RXP  (via drill 0.3)
  Top 0.2: v36.3,17.99 36.13,17.99 35.81,17.66 35.81,17.17 R15.2 | v37.28,18.97 37.12,18.8 36.79,19.13 36.79,19.79 U2.16
  Bottom 0.2: v37.28,18.97 v36.3,17.99
NFC_TX1  (1 unrouted)
NFC_TX2  (1 unrouted)
NFC_VDD  (via drill 0.3)
  Top 0.2: U2.27 39.57,23.87 39.41,23.71 39.57,23.55 39.57,23.22 U2.26 39.73,23.22 40.22,23.22 v40.71,23.71 | C15.1 21.26,25.67 21.26,23.38 22.4,22.24 22.56,22.24 22.73,22.07 24.04,22.07 24.36,22.4 30.25,22.4 30.74,22.89 30.74,23.38 C16.1 30.74,23.55 30.74,23.87 31.07,24.2 31.23,24.2 31.72,24.69 31.72,24.85 34.17,27.31 38.26,27.31 38.91,26.65 38.75,26.49 38.75,26.16 U2.31 38.75,26 v39.41,26
  Bottom 0.2: v40.71,23.71 40.71,24.69 v39.41,26
NFC_VDDHF  (1 unrouted)
NFC_VEN  (1 unrouted)
NFC_VMID  (1 unrouted)
NFC_XTAL1  (via drill 0.3)
  Top 0.2: 42.51,23.22 42.51,23.05 43.33,22.24 44.8,22.24 45.62,23.05 45.62,23.55 C20.1 | 42.51,23.22 42.67,23.22 Y1.1 42.51,23.22 | v40.88,26.82 40.22,26.16 40.22,25.84 39.73,25.34 U2.30 | 42.51,23.22 v41.86,23.22
  Bottom 0.2: v40.88,26.82 42.51,25.18 42.51,23.87 v41.86,23.22
NFC_XTAL2  (via drill 0.3)
  Top 0.2: 44.64,24.2 44.8,24.2 45.29,24.69 47.09,24.69 47.74,24.04 47.74,23.71 C21.1 | 44.64,24.2 44.31,24.2 Y1.3 44.64,24.2 | v40.88,25.84 40.88,25.34 40.22,24.69 39.73,24.69 U2.29 | v41.86,24.85 42.18,25.18 43.66,25.18 44.64,24.2
  Bottom 0.2: v41.86,24.85 v40.88,25.84
RF_50OHM
  Top 0.2: L6.2 42.84,56.74 42.84,57.23 42.35,57.72 41.86,57.72 C43.1 41.69,57.72 41.2,57.72 40.88,58.04 40.71,58.04 | 40.71,58.04 39.9,58.04 38.91,59.02 38.91,59.35 C44.1 | 40.71,58.04 40.71,59.19 41.04,59.52 41.04,60.01 R22.1
SPK_N  (1 unrouted)
SPK_P  (1 unrouted)
SW1
  Top 0.2: U5.9 46.76,38.42 46.93,38.42 47.09,38.26 47.25,38.26 47.42,38.42 49.71,38.42 49.71,37.93 L1.1
SW2
  Top 0.2: U5.7 46.76,37.44 47.25,37.44 47.42,37.28 47.58,37.44 48.4,37.44 49.05,36.79 50.52,36.79 51.5,37.77 L1.2
TS  (1 unrouted)
USB_DN  (1 unrouted)
USB_DN_J  (1 unrouted)
  Bottom 0.2: J1.A7 34.83,60.99 34.83,60.33 34.17,59.68 34.17,59.52 33.68,59.02 33.19,59.02 32.87,58.7 29.76,58.7 28.29,60.17 28.29,63.28 28.78,63.77 33.52,63.77 34.17,63.11 34.17,62.62 J1.B7
USB_DP  (1 unrouted)
USB_DP_J  (1 unrouted)
  Bottom 0.2: J1.B6 34.66,62.46 34.66,61.97 34.34,61.64 34.34,61.15 J1.A6
VBAT  (2 unrouted)
  Top 0.2: 29.59,26.82 29.59,27.14 U3.2 | 29.59,26.82 29.59,26.65 U3.3 | 38.75,36.46 38.75,41.37 C7.1 | 44.31,30.9 44.47,30.74 U4.2 | 44.31,30.9 38.75,36.46 | U4.2 U4.3 | U4.2 | 29.59,26.82 29.43,26.82 28.61,27.63 37.44,36.46 38.75,36.46 | 44.31,30.9 42.02,28.61 42.02,26.65 42.84,25.84 45.13,25.84 45.78,26.49 45.78,26.98 C6.1
VBUS  (via drill 0.3)  (1 unrouted)
  Top 0.2: U4.13 47.42,32.05 49.87,32.05 50.36,31.56 50.36,31.07 50.2,30.9 50.2,29.92 50.36,29.76 50.36,29.59 48.73,27.96 48.56,27.96 48.4,27.8 48.4,27.14 C4.1 | v33.19,60.01 34.01,60.01 R6.1 34.01,59.84 34.01,59.35 v34.5,58.86 | v25.84,57.06 25.51,57.06 25.02,56.57 25.02,55.92 D1.5
  Bottom 0.2: v33.19,60.01 33.35,60.17 33.35,60.99 J1.A4 33.35,61.15 33.35,61.64 33.19,61.8 33.19,62.46 J1.B9 | J1.B4 35.65,62.46 35.65,61.8 35.81,61.64 35.81,61.15 J1.A9 35.81,60.99 35.81,60.33 35.48,60.01 35.15,60.01 34.17,59.02 | v25.84,57.06 27.14,58.37 33.03,58.37 33.35,58.7 33.85,58.7 34.17,59.02 | v34.5,58.86 34.34,58.86 34.17,59.02
VBUS_SENSE  (1 unrouted)
  Top 0.2: R7.1 37.12,56.9 36.3,56.9 35.15,58.04 35.15,59.35 34.99,59.52 34.99,59.84 R6.2
VDD_TX  (via drill 0.3)  (1 unrouted)
  Top 0.2: U2.22 39.73,21.26 40.22,21.26 40.71,20.77 40.71,20.6 38.75,18.64 38.59,18.64 v38.26,18.97 37.77,19.46 37.77,19.79 U2.18 | v35.65,18.97 35.81,19.13 35.81,19.79 U2.14 | C14.1 23.38,25.67 23.38,25.18 23.87,24.69 25.02,24.69 25.34,25.02 25.34,25.67 C13.1
  Bottom 0.2: v35.65,18.97 36.3,18.97 36.95,19.62 37.61,19.62 v38.26,18.97
VLED  (via drill 0.3)
  Top 0.2: U7.5 50.2,45.95 49.54,45.95 U7.6 49.38,46.11 49.22,46.27 44.8,46.27 43,44.47 41.53,44.47 C33.1 41.37,44.47 39.73,44.47 37.28,46.93 36.3,46.93 35.15,48.07 34.66,48.07 U8.5 34.5,48.23 34.5,48.56 34.01,48.56 29.59,52.98 29.59,54.45 25.18,58.86 | 14.55,55.59 17.33,58.37 17.33,58.7 17.82,59.19 | 14.55,55.59 14.06,55.1 13.73,55.1 13.57,55.27 12.92,55.27 LED21.1 12.75,55.1 12.75,54.77 12.26,54.28 12.26,52.65 9.65,50.03 9.16,50.03 8.99,49.87 8.83,49.87 LED20.1 8.67,49.71 8.67,49.38 8.18,48.89 8.18,45.45 6.38,43.66 6.05,43.66 LED19.1 5.89,43.49 5.89,39.24 5.72,39.08 5.72,32.7 4.74,31.72 4.74,30.74 LED18.1 4.91,30.58 4.91,29.76 6.87,27.8 6.87,24.85 6.21,24.2 LED17.1 6.38,24.04 6.38,23.38 9.65,20.11 9.65,18.97 9.32,18.64 9.32,18.15 LED16.1 9.48,18.15 10.3,17.33 10.63,17.33 13.9,14.06 13.9,13.73 13.73,13.57 13.73,12.92 LED15.1 13.9,12.75 14.23,12.75 14.72,12.26 16.35,12.26 18.97,9.65 18.97,9.16 19.13,8.99 19.13,8.83 LED14.1 19.29,8.67 19.62,8.67 20.11,8.18 23.55,8.18 25.34,6.38 25.34,6.05 LED13.1 25.51,5.89 30.9,5.89 32.05,4.74 LED12.1 32.21,4.58 34.99,4.58 36.13,5.72 37.93,5.72 38.75,4.91 LED11.1 38.91,4.74 40.71,4.74 43,7.03 44.64,7.03 44.96,6.7 45.29,6.7 LED10.1 45.45,6.54 46.11,6.54 49.54,9.98 50.52,9.98 50.85,9.65 51.34,9.65 LED9.1 51.5,9.81 52.16,10.46 52.16,11.12 55.27,14.23 55.59,14.23 55.75,14.06 56.41,14.06 LED8.1 56.57,14.06 57.39,14.88 57.72,14.88 60.99,18.15 60.99,18.64 | 17.82,59.19 18.15,59.52 LED22.1 | 25.18,58.86 24.85,58.86 24.53,58.53 19.29,58.53 18.15,59.68 LED22.1 | 25.18,58.86 25.67,58.86 LED23.1 25.18,58.86
  Top 0.2: 14.55,55.59 20.77,49.38 20.77,44.47 21.42,44.47 C32.1 | 17.82,59.19 v17.01,60.01 | 17.82,59.19 LED22.1 | LED1.1 47.74,57.06 48.23,57.06 48.56,57.39 53.63,57.39 54.45,56.57 54.77,56.57 LED2.1 54.94,56.41 54.94,55.75 54.77,55.59 54.77,55.27 57.88,52.16 58.53,52.16 59.19,51.5 LED3.1 59.35,51.34 59.35,50.85 59.02,50.52 59.02,49.54 62.46,46.11 62.46,45.45 LED4.1 62.3,45.29 62.3,44.96 61.97,44.64 61.97,43 v63.11,41.86 64.26,40.71 64.26,38.91 LED5.1 64.09,38.75 63.28,37.93 63.28,26 LED6.1 63.11,25.84 62.78,25.84 60.99,24.04 60.99,20.6 60.66,20.27 60.66,19.79 LED7.1 60.66,19.62 60.66,19.13 60.99,18.8 60.99,18.64 | 60.99,18.64 v61.15,18.64
  Bottom 0.2: C118.1 3.93,28.29 4.25,28.29 5.56,26.98 5.56,22.07 6.05,21.58 C117.1 6.21,21.75 6.38,21.75 10.3,17.82 10.3,16.02 9.98,15.7 9.98,15.53 C116.1 9.98,15.37 9.98,15.21 10.3,15.21 15.04,10.46 C115.1 15.21,10.3 15.53,9.98 17.66,9.98 21.09,6.54 C114.1 21.09,6.38 21.09,6.21 21.42,5.89 26.16,5.89 27.8,4.25 27.8,3.93 C113.1 27.96,3.93 34.5,3.93 34.99,3.43 34.99,3.11 C112.1 35.15,2.95 41.53,2.95 42.18,3.6 | C106.1 65.56,27.31 65.56,22.89 63.28,20.6 C107.1 63.11,20.6 v61.15,18.64 60.01,17.5 60.01,15.21 59.52,14.72 C108.1 59.52,14.55 54.77,9.81 C109.1 54.61,9.65 54.28,9.32 51.99,9.32 48.89,6.21 48.89,6.05 C110.1 48.73,6.05 48.56,5.89 48.56,5.72 46.44,3.6 42.18,3.6 | 42.18,3.6 C111.1 | C119.1 3.6,42.18 3.6,46.44 5.72,48.56 5.89,48.56 6.05,48.73 C120.1 6.05,48.89 6.21,48.89 9.32,51.99 9.32,54.28 9.65,54.61 C121.1 9.81,54.77 14.55,59.52 C122.1 14.72,59.52 15.21,60.01 v17.01,60.01 21.75,60.01 22.07,59.68 22.4,59.68 C123.1 | 63.6,42.35 63.11,42.84 63.11,47.58 62.78,47.91 62.62,47.91 C104.1 62.46,47.91 59.02,51.34 59.02,53.47 58.7,53.79 C103.1 58.53,53.96 53.79,58.7 53.79,59.02 53.63,59.02 C102.1 53.47,59.02 53.3,59.02 52.98,58.7 46.11,58.7 45.78,59.02 45.78,59.19 C101.1 | 63.6,42.35 64.75,41.2 65.08,41.2 C105.1 | 63.6,42.35 v63.11,41.86
VSYS
  Top 0.2: 48.23,30.25 48.23,30.74 U4.11 | 45.45,28.94 44.15,28.94 43,27.8 43,27.14 C5.1 | 45.45,28.94 45.95,28.94 U4.5 | 48.23,30.25 48.73,30.25 48.89,30.09 48.89,29.59 48.07,28.78 48.07,28.61 47.58,28.12 46.44,28.12 | 46.44,28.12 45.78,28.12 45.45,28.45 45.45,28.94 | 48.23,30.25 U4.10 | 41.69,25.51 45.29,25.51 45.78,26 46.11,26 46.6,26.49 46.6,26.82 46.44,26.98 46.44,27.31 46.6,27.47 46.6,27.63 46.76,27.8 46.44,28.12 | 41.69,25.51 41.53,25.51 40.22,24.2 39.73,24.2 U2.28 | U2.13 35.15,19.95 34.83,19.95 U2.12 34.83,19.79 34.83,19.13 34.5,18.8 33.35,18.8 32.21,19.95 31.56,19.95 31.07,19.46 31.07,18.15 30.74,17.82 28.29,17.82 28.12,17.99 23.55,17.99 22.73,18.8 22.73,19.95 | 22.73,19.95 21.91,19.95 20.93,20.93 20.93,24.69 20.27,25.34 20.27,26 21.26,26.98 25.34,26.98 | 22.73,19.95 22.89,19.95 23.22,20.27 23.55,20.27 23.87,20.6 23.87,20.77 TP5.1 | 25.34,26.98 26.16,26.16 26.16,25.18 26.49,24.85 26.65,24.85 26.98,24.53 27.47,24.53 27.8,24.85 28.29,24.85 C12.1 28.45,24.85 29.76,24.85 C11.1 29.92,24.85 29.92,25.34 30.09,25.51 30.25,25.51 30.41,25.67 32.05,25.67 34.01,27.63 41.04,27.63 41.69,26.98 41.69,25.51 | U6.7 24.69,47.58 25.02,47.58 U6.8 25.18,47.42 25.51,47.42 26,46.93 31.07,46.93 32.54,45.45 32.54,44.31 | 32.54,44.31 32.37,44.31 31.56,43.49 31.07,43.49 C30.1 | 32.54,44.31 32.7,44.15 C29.1 | 32.54,44.31 C29.1 | 44.15,38.91 44.31,39.08 44.31,39.24 44.47,39.41 44.8,39.41 44.96,39.24 44.96,38.91 U5.1 45.13,38.91 46.6,38.91 U5.10 46.76,38.91 46.76,39.24 49.38,41.86 49.38,43.33 U7.1 49.38,43.49 49.38,44.31 49.87,44.8 51.5,44.8 52.16,45.45 52.16,46.6 51.67,47.09 48.56,47.09 48.07,47.58 48.07,48.23 C31.1
  Top 0.2: 44.15,38.91 43.49,38.26 43.49,36.79 44.64,35.65 44.64,34.66 45.29,34.01 45.29,33.52 C8.1 | 32.54,43.33 32.54,43.98 C29.1 | 32.54,43.33 33.03,42.84 39.73,42.84 39.9,42.67 40.22,42.67 43.98,38.91 44.15,38.91 | 25.34,26.98 32.54,34.17 32.54,43.33
(copper drawn outside any net)
  shapes: Bottom area x1, Top area x1

## Text on the board
tDocu: BRANDING AREA (keep clear) | ORB 69 mm - ENGINEERING DRAFT